# Altium PCB ProbeAmp.PcbDoc (part 2 of 2)
Units mm, origin at the board's own origin, x right, y up, seen from the top; angles counter-clockwise.
Board outline 75 x 25 mm, 6 copper layers (L1, L2, L3, L4, L5, L6), stack 1.04 mm thick; 123 components, 72 nets, 387 pads, 161 vias.
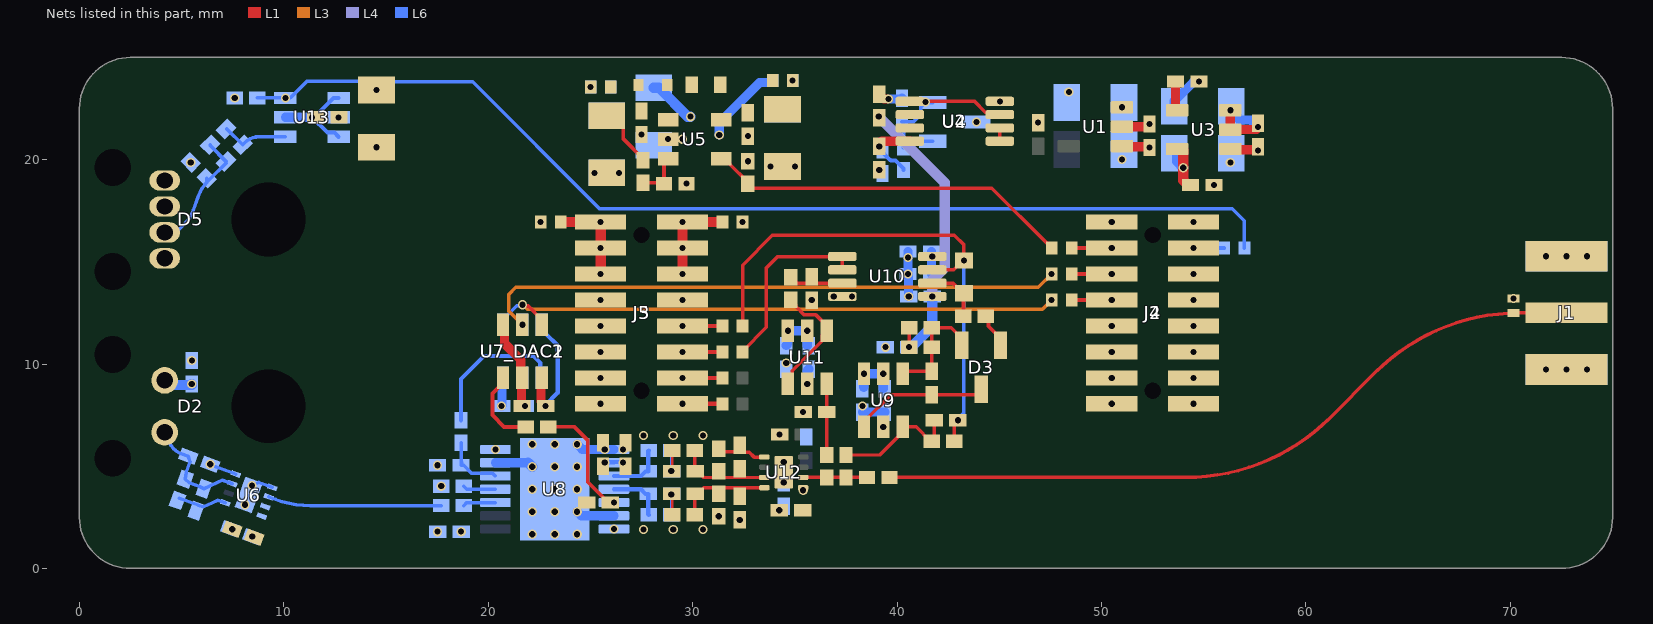
[diagram p6: the nets of this part, all layers, seen from the top]

## Via types
v1: diameter 0.45, hole 0.3, L1 to L6, tented both sides, 157 vias
v2: diameter 0.45, hole 0.3, L1 to L6, 4 vias

## Nets (pads, with @x,y where several pads share a name; then routed paths per layer and width w, separated by ;. In a path a pad name is that pad's centre, name@x,y a point inside that pad or via, vN(x,y) a via of type N, cw(c..) or ccw(c..) an arc to the next point about the centre after c; other vN are vias at no path point) (continued)
+2V50REF: C6.2 C23.1 C24.1 C34.1 C36.1 R7.1 R11.2 R13.2 U2.6 U2.7 U6.4 U10.5 | length 15.8
  L1 w0.171: R13.2@40.6,10.825 v1(40.575,10.825) 40.6,10.85 R11.2@40.6,11.775
  L1 w0.5: v1(39.1,22.1) 39.125,22.075 C6.2@39.125,22.046
  L4 w0.5: v1(39.1,22.1) 42.327,18.873 42.327,14.711 41.722,14.106 v1(41.722,13.308)
  L6 w0.171: C23.1@6.393,5.074 U6.4@7.643,4.619
  L6 w0.5: v1(40.575,10.825) 40.7,10.825 41.722,11.847 v1(41.722,13.308)
  other v1: 18.675,1.8 17.7,4.025 6.402,5.098
+3V3.CMN: J3.10 J5.10
  other v1: 25.5,11.865
+5V0: C1.2 C3.2 C19.2 C20.1 C25.1 C26.2 C27_DAC1.1 C27_DAC2.1 C31.2 C32.1 C46.1 C47.2 C50.2 C51.1 C52.2 C53.1 C55.2 C56.1 L1.1 L7.1 R1.2 R23.2 U1.1 U1.3 U2.8 U6.7 U6.8 U7_DAC1.3 U7_DAC1.6 U7_DAC2.3 U8.7 U8.9 U8.14 U9.5 U9.6 U10.8 U11.5 U11.6 U13.1 U13.3 U13.5 | length 28.1
  L1 w0.45: U7_DAC2.3@22.579,9.347 22.579,8.172 22.604,8.147 22.604,8.022 22.679,7.947 v1(22.804,7.947) ; v1(39.125,20.647) 39.125,20.772 39.254,20.9 U2.8@40.625,20.9 ; U1.1@51,20.659 51.034,20.625 52.316,20.625 v1(52.35,20.59)
  L6 w0.2: U13.3@12.677,21.117 12.477,21.317 12.127,21.317 v1(11.377,22.067) 11.425,22.115 11.525,22.115 12.427,23.017 U13.1@12.677,23.017 ; U7_DAC1.6@22.619,11.922 22.619,11.672 22.819,11.472 22.828,11.472 23.4,10.9 23.4,8.597 22.804,8 v1(22.804,7.947) ; U8.9@26.15,5.175 25.725,5.175 25.7,5.2 U8.9@26.6,5.2 ; C20.1@39.288,20.472 39.288,20.347 39.658,19.977 39.683,19.977 39.698,19.962 39.918,19.962 40.313,19.567 R1.2@40.313,19.492
  L6 w0.45: U13.5@10.077,22.067 v1(11.377,22.067) ; v1(20.654,7.947) 20.666,7.96 U7_DAC1.3@20.666,9.332 ; v1(31.3,21.2) 31.3,21.8 33.266,23.766 33.85,23.766 33.91,23.826 L1.1@33.91,23.861 ; C52.2@34.58,10.9 34.645,10.965 34.645,11.615 v1(34.655,11.625) v1(35.605,11.625) C51.1@35.605,10.9 ; C47.2@38.365,8.865 38.365,9.515 v1(38.375,9.525) v1(39.325,9.525) C46.1@39.325,8.8 ; C53.1@41.685,14.408 C50.2@41.685,15.508
  other v1: 8.458,1.555 26.15,1.925 25.7,5.175 26.6,5.175 20.35,5.825 41.722,15.258 32.44,16.95 5.451,19.864 51,22.559 14.527,23.404
+5V0AMP: J3.1 J3.3 J3.5 J5.1 J5.3 J5.5 L7.2 | length 4.5
  L1 w0.5: v1(29.5,14.405) v1(29.5,15.675) v1(29.5,16.945) 29.503,16.948 31.457,16.948 L7.2@31.46,16.95
+VBIAS: C16.2 C22.1 D2.2 L4.2 | length 3.7
  L6 w0.5: D2.2@4.173,8.974 4.174,8.976 C22.1@5.5,8.976 ; v1(5.499,9.024) C22.1@5.5,9.025 ; C16.2@28.1,23.511 28.35,23.511 29.761,22.1 v1(29.9,22.1)
-2V5: C8.2 C10.2 C48.2 C49.1 U3.5 U12.5 U12.9 | length 3
  L1 w0.5: U3.5@53.7,20.516 53.95,20.516 54,20.466 54,20.216 54,18.981 54.224,18.757 C10.2@54.349,18.757
  L6 w0.5: C8.2@53.7,20.207 53.7,19.909 54,19.609 v1(54,19.6)
  other v1: 35.405,3.825
  other v2: 34.455,4.2 34.455,5.2
-5V0: C7.2 C9.2 L6.1 U3.2 U3.3 | length 4.1
  L1 w0.45: v1(56.3,22.416) U3.2@56.3,21.466 57.575,21.466 57.65,21.541 v1(57.65,21.597)
  L6 w0.45: v1(56.3,22.416) 56.3,22.409 56.775,21.934 57.313,21.934 v1(57.65,21.597)
  other v1: 22.56,16.95
-5V0AMP: J3.2 J3.4 J3.6 J5.2 J5.4 J5.6 L6.2 | length 4.5
  L1 w0.5: L6.2@23.54,16.95 23.543,16.948 25.497,16.948 v1(25.5,16.945) v1(25.5,15.675) v1(25.5,14.405)
BIAS.EN: L10.1 R4.2 U5.4 | length 18
  L1 w0.177: U5.4@31.4,20.05 31.57,20.05 31.812,19.809 31.812,19.777 32.284,19.304 32.294,19.304 R4.2@32.7,18.897 ; R4.2@32.7,18.822 32.922,18.6 44.635,18.6 47.329,15.907 47.364,15.907 47.56,15.71 L10.1@47.56,15.675
CMN.ADC1_SPR: J3.14 J5.14
  other v1: 25.5,9.325
CMN.AMP_EN: J2.5 J4.5
  other v1: 54.5,14.405
CMN.AN0: J3.9 J5.9 L11.2 | length 2
  L1 w0.2: v1(29.5,11.865) L11.2@31.46,11.865
CMN.AN1: J3.11 J5.11 L12.2 | length 2
  L1 w0.2: v1(29.5,10.595) L12.2@31.46,10.595
CMN.AN2: J3.13 J5.13 L13.2 | length 2
  L1 w0.2: v1(29.5,9.325) L13.2@31.46,9.325
CMN.AN3: J3.15 J5.15 L14.2 | length 2
  L1 w0.2: v1(29.5,8.055) L14.2@31.46,8.055
CMN.FIBER_RX: J2.1 J4.1
  other v1: 54.5,16.945
CMN.FIBER_TX: J2.3 J4.3 L15.2 | length 1.5
  L6 w0.177: v1(54.5,15.675) L15.2@56.01,15.675
CMN.GPIO0: J2.2 J4.2
  other v1: 50.5,16.945
CMN.GPIO1: J2.4 J4.4 L10.2 | length 2
  L1 w0.177: L10.2@48.54,15.675 v1(50.5,15.675)
CMN.I2C4_SCL: J2.6 J4.6 L8.2 | length 2
  L1 w0.177: L8.2@48.54,14.374 48.571,14.405 v1(50.5,14.405)
CMN.I2C4_SDA: J2.8 J4.8 L9.2 | length 2
  L1 w0.177: L9.2@48.54,13.102 48.573,13.135 v1(50.5,13.135)
CMN.SPI1_CS1: J2.9 J4.9
  other v1: 54.5,11.865
CMN.SPI1_MISO: J2.11 J4.11
  other v1: 54.5,10.595
CMN.SPI1_MOSI: J2.13 J4.13
  other v1: 54.5,9.325
CMN.SPI1_SCK: J2.15 J4.15
  other v1: 54.5,8.055
CMN.USB_DM: J2.14 J4.14
  other v1: 50.5,9.325
CMN.USB_DP: J2.12 J4.12
  other v1: 50.5,10.595
CMN.VBAT1: J3.12 J5.12
  other v1: 25.5,10.595
COM: C1.1 C2.1 C3.1 C4.1 C5.1 C6.1 C7.1 C8.1 C9.1 C10.1 C11.1 C12.1 C13.1 C14.1 C15.1 C16.1 C17.1 C18.1 C19.1 C20.2 C22.2 C24.2 C25.2 C26.1 C27_DAC1.2 C27_DAC2.2 C28_DAC1.1 C28_DAC2.1 C31.1 C32.2 C34.2 C36.2 C40.2 C41.1 C43.1 C44.1 C45.2 C46.2 C47.1 C48.1 C49.2 C50.1 C51.2 C52.1 C53.2 C55.1 C56.2 D4.2 D5.1 D5.2 D5.4 J1.2 J2.7 J2.10 J2.16 J3.7 J3.8 J3.16 J4.7 J4.10 J4.16 J5.7 J5.8 J5.16 R3.1 R4.1 R22.2 R25.2 U1.2 U2.4 U3.1 U4.3 U5.2 U6.5 U6.9 U7_DAC1.2 U7_DAC2.2 U7_DAC2.6 U8.6 U8.8 U8.13 U8.15 U9.2 U10.4 U11.2 U13.2 | length 23.7
  L1 w0.45: U7_DAC2.6@20.719,11.925 20.794,11.85 20.794,11.006 21.594,10.206 21.594,9.4 U7_DAC2.2@21.669,9.325 ; U7_DAC2.2@21.629,9.347 21.629,8.022 21.704,7.947 v1(21.804,7.947) ; C6.1@39.125,23.196 39.125,23.071 39.2,22.996 39.325,22.996 39.358,22.963 v1(39.57,22.963) ; U1.2@51,21.609 52.275,21.609 52.35,21.684 v1(52.35,21.74) ; v1(55.499,18.757) C10.1@55.624,18.757 ; U3.1@56.3,20.516 56.334,20.482 57.615,20.482 v1(57.65,20.447)
  L6 w0.171: v2(8.45,4.059) 8.77,4.209 U6.5@9.428,3.969
  L6 w0.45: U8.6@20.35,5.175 U8.15@21.95,5.175 ; U7_DAC1.2@21.629,9.345 21.629,8.022 21.704,7.947 v1(21.804,7.947) ; v1(24.35,2.775) 24.55,2.575 U8.13@26.15,2.575 ; v1(24.35,6.075) 24.6,5.825 v1(25.7,5.825) U8.8@26.15,5.825 ; v1(35.605,9.025) 35.605,9.675 C51.2@35.68,9.75 ; C47.1@38.3,7.65 C46.2@39.4,7.65 39.325,7.575 v1(39.325,6.925) ; v1(39.57,22.963) 40.193,22.963 C5.1@40.238,23.008 ; C50.1@40.535,15.508 v1(40.535,15.208) v1(40.535,14.408) 40.553,14.39 40.553,13.326 v1(40.572,13.308) ; C7.1@53.55,22.609 53.55,22.859 54.507,23.816 v1(54.767,23.816)
  L6 w0.5: U8.15@21.95,5.175 v1(22.15,4.975)
  other v1: 22.15,1.675 23.25,1.675 24.35,1.675 17.525,1.8 27.6,1.9 29.05,1.9 30.5,1.9 7.478,1.921 32.3,2.375 31.275,2.552 22.15,2.775 23.25,2.775 34.235,2.85 22.15,3.875 23.25,3.875 24.35,3.875 23.25,4.975 24.35,4.975 17.519,5.05 26.6,5.825 22.15,6.075 23.25,6.075 27.6,6.5 29.05,6.5 30.5,6.5 34.255,6.55 35.405,7.65 38.3,7.95 25.5,8.055 50.5,8.055 71.75,9.73 72.75,9.73 73.75,9.73 34.58,10.05 5.5,10.175 39.425,10.825 50.5,11.865 25.5,13.135 29.5,13.135 35.822,13.125 54.5,13.135 70.15,13.2 36.9,13.3 37.8,13.3 71.75,15.27 72.75,15.27 73.75,15.27 29.7,18.825 25.2,19.349 26.4,19.349 39.125,19.497 33.8,19.661 35,19.661 56.3,19.857 32.7,19.922 51,20 14.527,20.604 28.8,21 29.5,21 32.7,21.147 27.5,21.225 46.9,21.809 43.888,21.842 12.677,22.067 45.025,22.85 7.602,23.017 48.4,23.3
  other v2: 8.108,3.119
Envelope: C33.2 C37.2 L11.1 R15.1 U10.7 | length 26.1
  L1 w0.171: L11.1@32.44,11.865 32.44,14.84 33.9,16.3 42.8,16.3 43.272,15.828 v1(43.272,15.064) 43.222,15.064 42.766,14.608 U10.7@41.722,14.608 ; R15.1@42.8,6.227 42.8,7.077 v1(42.975,7.252)
  L6 w0.171: v1(42.975,7.252) 42.975,7.328 43.272,7.625 v1(43.272,15.064)
FIBER.Tx: L15.1 R25.1 U13.6 | length 52.8
  L6 w0.171: R25.1@8.702,23.017 v1(10.077,23.017) 10.327,23.017 11.155,23.844 14.709,23.844 14.754,23.8 19.241,23.8 25.441,17.6 56.4,17.6 56.99,17.01 L15.1@56.99,15.675
GAIN: C28_DAC1.2 R6_DAC1.2 U8.5 | length 3.1
  L6 w0.171: R6_DAC1.2@18.669,6.15 C28_DAC1.2@18.669,5.05 ; C28_DAC1.2@18.7,5.196 C28_DAC1.2@18.669,5.05 ; U8.5@20.35,4.525 20.21,4.665 19.179,4.665 18.794,5.05 C28_DAC1.2@18.669,5.05
I2C.SCL.5V: L8.1 U7_DAC1.5 U7_DAC2.5 | length 28.7
  L1 w0.171: v1(21.669,11.922) U7_DAC2.5@21.669,11.925
  L3 w0.177: v1(21.669,11.922) 21,12.591 21,13.4 21.351,13.751 46.906,13.751 v1(47.56,14.405)
I2C.SDA.5V: L9.1 U7_DAC1.4 U7_DAC2.4 | length 29.2
  L1 w0.171: v1(21.669,12.9) 21.722,12.847 21.947,12.847 22.619,12.175 U7_DAC2.4@22.619,11.925
  L3 w0.171: v1(21.669,12.9) 21.693,12.9 21.908,12.685 47.11,12.685 v1(47.56,13.135)
  L6 w0.171: U7_DAC1.4@20.719,11.922 20.719,12.172 21.393,12.847 v1@21.642,12.847 ; v1@21.647,12.847 v1@21.642,12.847 ; v1@21.695,12.9 v1@21.642,12.847
IN: R10.1 U6.6 | length 8.5
  L6 w0.171: U6.6@9.257,3.499 9.594,3.377 ccw(c11.304,8.075) 11.304,3.075 R10.1@17.7,3.075
IN_N: C30.2 C42.2 R9.2 R21.1 | length 2.1
  L1 w0.115: v1(28.95,3.625) 29,3.575 R21.1@29,2.625
  L6 w0.115: R9.2@28.95,2.625 v1(28.95,3.625) C30.2@28.975,3.65
IN_P: C29.2 C38.2 R8.2 R18.1 | length 2.1
  L1 w0.115: v1(28.95,4.775) 29,4.825 R18.1@29,5.775
  L6 w0.115: R8.2@28.95,5.775 v1(28.95,4.775) C29.2@28.975,4.75
NetC5_2: C5.2 R1.1 U2.3 U2.5 U4.1 U4.2 | length 9.6
  L1 w0.177: U2.5@40.625,22.85 43.788,22.85 44.316,22.322 44.903,22.322 U2.3@45.025,22.2
  L6 w0.177: R1.1@40.313,20.592 R1.1@40.313,20.655 ; v1(41.393,22.819) U4.2@41.42,22.792 ; U4.1@41.738,20.892 40.549,20.892 R1.1@40.313,20.655 ; U4.2@41.738,22.792 U4.2@41.42,22.792 ; R1.1@40.313,20.655 40.313,21.783 C5.2@40.238,21.858 40.803,21.858 41.151,22.206 41.151,22.555 41.388,22.792 U4.2@41.42,22.792
NetC11_2: C11.2 U3.4 | length 1.4
  L1 w0.45: C11.2@53.617,23.816 53.617,22.491 53.692,22.416 U3.4@53.7,22.416
NetC12_2: C12.2 L1.2 L2.1
  other v1: 34.89,23.861
NetC13_2: C13.2 C17.2 L2.2 L5.1 U5.5
NetC14_2: C14.2 C18.2 D1.1 L3.1 R2.2 | length 3.1
  L1 w0.177: C14.2@25.8,22.149 26.05,22.149 26.612,21.587 26.612,21.009 27.575,20.045 R2.2@27.575,19.97
NetC15_2: C15.2 L3.2 L4.1
  other v1: 25.007,23.549
NetC21_1: C21.1 C23.2 D2.1 R5.1 U6.3 | length 5.6
  L6 w0.171: D2.1@4.173,6.658 4.419,6.131 ccw(c5.325,6.554) 4.983,5.614 C23.2@5.321,5.491 5.415,5.228 5.219,4.689 R5.1@5.179,4.369 5.37,4.194 5.906,3.998 C21.1@6.099,3.9 7,4.321 U6.3@7.472,4.149 U6.3@7.324,4.224
NetC21_2: C21.2 R5.2 U6.1 | length 2.4
  L6 w0.171: R5.2@4.882,3.439 5.808,3.101 5.824,3.096 6.065,3.008 6.774,3.339 U6.1@7.13,3.209
NetC29_1: C29.1 R8.1 U8.10 | length 2.8
  L6 w0.2: U8.10@26.15,4.525 27.475,4.525 27.7,4.75 C29.1@27.825,4.75 27.825,5.75 R8.1@27.85,5.775
NetC30_1: C30.1 R9.1 U8.11 | length 2.8
  L6 w0.2: U8.11@26.15,3.875 27.475,3.875 27.7,3.65 C30.1@27.825,3.65 27.825,2.65 R9.1@27.85,2.625
NetC33_1: C33.1 R12.2 U10.6 | length 2.9
  L1 w0.18: U10.6@41.722,13.958 42.727,13.958 43.222,13.464 C33.1@43.272,13.464 43.243,13.436 R12.2@43.243,12.338
NetC35_1: C35.1 D3.2 R11.1 R13.1 U9.4 | length 5.6
  L1 w0.171: U9.4@40.275,9.525 40.4,9.65 C35.1@41.7,9.65 R13.1@41.7,10.825 R11.1@41.7,11.775 42.648,11.775 43.16,11.263 D3.2@43.16,10.913
NetC35_2: C35.2 D3.3 U9.1 | length 6.7
  L1 w0.171: U9.1@38.375,7.175 39.7,8.5 C35.2@41.7,8.5 43.87,8.5 44.11,8.74 D3.3@44.11,8.763 ; U9.1@38.394,6.925 U9.1@38.394,7.175
NetC37_1: C37.1 R14.1 R15.2 U9.3 | length 6.3
  L1 w0.171: R14.1@37.505,5.55 39.169,5.55 ; 39.15,5.55 40.275,6.675 U9.3@40.275,6.925 40.927,6.925 41.625,6.227 R15.2@41.7,6.227 41.825,6.352 C37.1@41.825,7.252
NetC38_1: C38.1 C39.2 R18.2 R19.1 U12.3 | length 5.1
  L1 w0.17: R18.2@30.1,5.775 30.1,4.775 C38.1@30.125,4.75 30.25,4.75 30.55,4.45 32.5,4.45 ; C39.2@32.3,4.9 C39.2@32.3,4.875 32.5,4.675 32.5,4.45 ; U12.3@33.505,4.45 32.5,4.45
NetC39_1: C39.1 R19.2 U12.1 | length 2.7
  L1 w0.17: R19.2@31.275,5.85 31.425,5.7 32.085,5.7 C39.1@32.3,5.915 ; C39.1@32.3,6.025 C39.1@32.3,5.915 ; U12.1@33.505,5.45 33,5.45 32.765,5.685 32.515,5.685 32.3,5.9 C39.1@32.3,5.915
NetC40_1: C40.1 R16.1 U10.3 | length 2.6
  L1 w0.171: R16.1@34.797,14.31 34.797,14.298 R16.1@35.037,14.058 ; R16.1@35.037,13.958 U10.3@37.322,13.958
NetC41_2: C41.2 R17.2 U11.3 | length 3.5
  L1 w0.18: R17.2@36.555,5.55 C41.2@36.555,7.65 U11.3@36.555,9.025
NetC42_1: C42.1 C43.2 R21.2 R22.1 U12.4 | length 4.5
  L1 w0.17: R21.2@30.1,2.625 30.1,3.625 C42.1@30.125,3.65 30.25,3.65 30.55,3.95 U12.4@33.505,3.95
NetC54_1: C54.1 R24.1 U13.4 | length 3.3
  L6 w0.18: R24.1@7.208,21.5 C54.1@7.986,20.723 8.087,20.824 cw(c8.794,20.117) 8.794,21.117 U13.4@10.077,21.117
NetC54_2: C54.2 D5.3 R23.1 R24.2 | length 6.5
  L6 w0.171: D5.3@4.173,16.213 4.513,16.213 4.968,16.668 5.114,16.814 ccw(c3.7,18.228) 5.581,17.55 5.819,18.208 cw(c7.7,17.529) 6.286,18.943 6.144,18.802 6.229,18.886 R23.1@6.229,19.086 ; R23.1@6.333,18.981 C54.2@7.173,19.82 ; R24.2@6.395,20.723 6.395,20.687 C54.2@7.173,19.91
NetD1_2: D1.2 L5.2 U5.1
NetD3_1: D3.1 R12.1 | length 1.7
  L1 w0.18: R12.1@44.343,12.338 44.475,12.207 44.475,11.848 45.06,11.263 D3.1@45.06,10.913
NetR2_1: R2.1 R3.2 U5.3 | length 2.4
  L1 w0.177: R2.1@27.575,18.87 28.555,18.87 R3.2@28.6,18.825 28.6,19.85 U5.3@28.8,20.05
NetR6_DAC1_1: R6_DAC1.1 U7_DAC1.1 | length 7.3
  L6 w0.2: R6_DAC1.1@18.669,7.25 18.669,9.269 19.795,10.395 22.205,10.395 22.545,10.055 22.545,9.396 U7_DAC1.1@22.619,9.322
NetR6_DAC2_1: R6_DAC2.1 U7_DAC2.1 | length 3.9
  L1 w0.2: U7_DAC2.1@20.719,9.325 20.719,9.075 20.199,8.555 20.199,7.501 20.778,6.922 R6_DAC2.1@21.842,6.922
NetR7_2: R7.2 U8.4 | length 1.6
  L6 w0.171: R7.2@18.8,4.025 18.95,3.875 U8.4@20.35,3.875
NetR10_2: R10.2 U8.3 | length 1.6
  L6 w0.171: R10.2@18.8,3.075 18.95,3.225 U8.3@20.35,3.225
NetR14_2: R14.2 R17.1 R20.1 U12.6 | length 3.1
  L1 w0.171: U12.6@35.405,4.45 R17.1@36.555,4.45 R20.1@38.53,4.45
NetR16_2: R16.2 U11.1 U11.4 | length 6
  L1 w0.171: U11.1@34.655,9.025 34.869,9.24 34.869,9.665 36.34,11.135 36.34,11.41 U11.4@36.555,11.625 36.555,11.875 36.03,12.4 35.458,12.4 35.036,12.822 35.036,12.91 R16.2@34.797,13.15
NetU2_1: U2.1 U2.2 | length 0.7
  L1 w0.177: U2.1@45.025,20.9 U2.2@45.025,21.55
Offset: L12.1 U10.1 U10.2 | length 9.2
  L1 w0.171: L12.1@32.44,10.595 32.44,10.63 33.6,11.79 33.6,14.7 34.158,15.258 U10.1@37.322,15.258 U10.2@37.322,14.608
OFS: C28_DAC2.2 R6_DAC2.2 U8.12 | length 6
  L1 w0.171: R6_DAC2.2@22.942,6.922 24.22,6.922 24.857,6.285 24.857,4.243 25.635,3.465 25.635,3.44 25.85,3.225 v1(26.15,3.225)
  L6 w0.171: v1(26.15,3.225) 26.175,3.225 U8.12@26.2,3.2
PROBE_OUT: D4.1 J1.1 R20.2 | length 36.2
  L1 w0.171: R20.2@39.63,4.45 54.108,4.45 ccw(c54.108,14.45) 61.179,7.379 63.371,9.571 cw(c70.442,2.5) 70.442,12.5 D4.1@70.15,12.5 J1.1@72.75,12.5
pads on no net: D2. D5. J4. J5. L13.1 L14.1 U1.4 U6.2 U8.1 U8.2 U12.2

## Polygon pours and split planes (outlines as drawn)
COM on L3 "COM_L03_P008" (solid, remove dead copper, pour order 8): 0.254,2.5 ccw(c2.5,2.5) 2.5,0.254 2.7,0.254 2.7,1.004 2.5,1.004 cw(c2.5,2.5) 1.004,2.5 1.004,22.5 cw(c2.5,22.5) 2.5,23.996 72.5,23.996 cw(c72.5,22.5) 73.996,22.5 73.996,2.5 cw(c72.5,2.5) 72.5,1.004 2.904,1.004 2.904,0.254 72.5,0.254 ccw(c72.5,2.5) 74.746,2.5 74.746,22.5 ccw(c72.5,22.5) 72.5,24.746 2.5,24.746 ccw(c2.5,22.5) 0.254,22.5
+5V0 on L3 "+5V0_L03_P006" (solid, remove dead copper, pour order 6): 1.204,2.5 ccw(c2.5,2.5) 2.5,1.204 9.4,1.204 9.4,2.7 5.6,2.7 5.6,5.7 21.8,5.7 21.8,4 25.8,4 25.8,1.7 27.1,1.7 27.1,8.5 39.5,8.5 39.5,11.4 41.2,11.4 41.2,6.1 35.1,6.1 35.1,4.1 48.8,4.1 48.8,18.3 36.2,18.3 36.2,15.3 31.103,15.3 29.803,16.6 25.283,16.6 24.783,16.1 22.1,16.1 22.1,17.5 24.203,17.5 24.703,18 30.383,18 31.683,16.7 34.8,16.7 34.8,19.7 52.6,19.7 52.6,21.3 56.8,21.3 56.8,22.504 58.2,22.504 58.2,19.9 54.97,19.9 54.97,17.1 50.2,17.1 50.2,2.7 33.7,2.7 33.7,6.1 29.7,6.1 29.7,1.204 72.5,1.204 ccw(c72.5,2.5) 73.796,2.5 73.796,22.5 ccw(c72.5,22.5) 72.5,23.796 2.5,23.796 ccw(c2.5,22.5) 1.204,22.5
-5V0 on L3 "-5V0_L03_P005" (solid, remove dead copper, pour order 5): 22.3,16.3 24.7,16.3 25.2,16.8 29.886,16.8 31.186,15.5 36,15.5 36,18.5 53.57,18.5 53.57,20.1 58,20.1 58,22.304 57,22.304 57,21.1 52.8,21.1 52.8,19.5 35,19.5 35,16.5 31.6,16.5 30.3,17.8 24.786,17.8 24.286,17.3 22.3,17.3
+2V50REF on L3 "+2V50REF_L03_P003" (solid, remove dead copper, pour order 3): 9.6,1.204 9.6,2.9 5.8,2.9 5.8,5.5 21.6,5.5 21.6,3.8 25.6,3.8 25.6,1.5 27.3,1.5 27.3,8.3 39.7,8.3 39.7,11.2 41,11.2 41,6.3 29.5,6.3 29.5,1.204
+VBIAS on L3 "+VBIAS_L03_P002" (solid, remove dead copper, pour order 2): 3.6,8.4 5.8,8.4 5.8,10.7 7.3,10.7 7.3,20 14.3,20 14.3,21.6 30.2,21.6 30.2,22.6 13.3,22.6 13.3,21 6.3,21 6.3,11.7 3.6,11.7
-2V5 on L3 "-2V5_L03_P004" (solid, remove dead copper, pour order 4): 33.9,2.9 33.9,6.1 34.9,6.1 34.9,3.9 49,3.9 49,18.3 53.77,18.3 53.77,19.9 54.77,19.9 54.77,17.3 50,17.3 50,2.9
COM on L5 "COM_L05_P010" (solid, remove dead copper, pour order 10): 0,2.5 0,22.5 cw(c2.5,22.5) 2.5,25 72.5,25 cw(c72.5,22.5) 75,22.5 75,2.5 cw(c72.5,2.5) 72.5,0 2.5,0 cw(c2.5,2.5)
COM on L2 "COM_L02_P001" (solid, remove dead copper, pour order 1): 0,2.5 0,22.5 cw(c2.5,22.5) 2.5,25 72.5,25 cw(c72.5,22.5) 75,22.5 75,2.5 cw(c72.5,2.5) 72.5,0 2.5,0 cw(c2.5,2.5)
COM on L4 "COM_L04_P007" (solid, remove dead copper, pour order 7): 0.254,2.5 ccw(c2.5,2.5) 2.5,0.254 2.7,0.254 2.7,1.004 2.5,1.004 cw(c2.5,2.5) 1.004,2.5 1.004,22.5 cw(c2.5,22.5) 2.5,23.996 72.5,23.996 cw(c72.5,22.5) 73.996,22.5 73.996,2.5 cw(c72.5,2.5) 72.5,1.004 2.904,1.004 2.904,0.254 72.5,0.254 ccw(c72.5,2.5) 74.746,2.5 74.746,22.5 ccw(c72.5,22.5) 72.5,24.746 2.5,24.746 ccw(c2.5,22.5) 0.254,22.5
COM on L6 "COM_L06_P000" (solid, remove dead copper, pour order 0): 0,2.5 0,22.5 cw(c2.5,22.5) 2.5,25 72.5,25 cw(c72.5,22.5) 75,22.5 75,2.5 cw(c72.5,2.5) 72.5,0 2.5,0 cw(c2.5,2.5)
COM on L1 "COM_L01_P009" (solid, remove dead copper, pour order 9): 0,2.5 0,22.5 cw(c2.5,22.5) 2.5,25 72.5,25 cw(c72.5,22.5) 75,22.5 75,2.5 cw(c72.5,2.5) 72.5,0 2.5,0 cw(c2.5,2.5)

## Keep-outs
L6:
  circle w0.05: c9.253,17.072 r2.75
  circle w0.05: c9.253,7.928 r2.75

## Other copper
L1:
  region net -2V5: 34.005,3.35 34.005,4.55 34.905,4.55 34.905,4.075 35.81,4.075 35.81,2.55 34.96,2.55 34.96,3.35
  region net NetC14_2: 24.9,21.499 24.9,22.799 25.202,22.799 ccw(c25.202,23.299) 25.702,23.299 25.702,23.954 27.8,23.954 27.8,21.95 27.151,21.95 ccw(c27.151,21.499) 26.7,21.499
  region net NetD1_2: 28.3,21.62 28.3,23.554 cw(c28.8,23.554) 28.8,24.054 30.25,24.054 30.25,23.254 29.739,22.743 ccw(c30.8,21.683) 29.3,21.683 29.3,21.62
  region net NetC13_2: 30.9,21.62 30.9,24.181 34.195,24.181 34.195,23.111 35.3,23.111 35.3,21.811 31.9,21.811 31.9,21.62
  region net +2V5: 34.98,6.25 34.98,6.853 35.855,6.853 35.855,4.825 35.155,4.825 35.155,6.25
  region net +2V50REF: 38.825,21.325 41.325,21.325 41.325,22.471 38.825,22.471
L2:
  pour cut-out: 37.975,6.275 38.775,6.275 38.775,7.311 39.764,8.3 41.3,8.3 41.3,7.988 44.535,7.988 44.535,9.538 43.585,9.538 43.585,11.913 43.743,11.913 43.743,12.964 43.822,12.964 43.822,15.564 42.722,15.564 42.722,14.933 40.922,14.933 40.922,13.633 42.743,13.633 42.743,12.2 41.2,12.2 41.2,10.175 39.875,10.175 39.875,8.7 39.645,8.7 38.52,7.575 37.975,7.575
  pour cut-out: 34.255,9.675 34.634,9.675 36.155,11.196 36.155,12.004 35.959,12.2 35.38,12.2 34.93,12.65 34.372,12.65 34.372,13.65 35.222,13.65 35.222,12.908 35.519,12.611 36.131,12.611 36.466,12.275 36.955,12.275 36.955,10.975 36.416,10.975 35.055,9.613 35.055,8.375 34.255,8.375
  pour cut-out: 30.6,2.2 30.6,3.152 31.9,3.152 31.9,3 32.7,3 32.7,3.725 33.855,3.725 33.855,4.675 32.7,4.675 32.7,5.225 33.855,5.225 33.855,5.675 33.035,5.675 32.7,6.01 32.7,6.55 31.9,6.55 31.9,6.35 30.85,6.35 30.85,6.2 29.6,6.2 29.6,2.2
L5:
  pour cut-out: 9.517,3.165 ccw(c11.304,8.075) 11.304,2.85 17.2,2.85 17.2,2.65 19.3,2.65 19.3,2.9 21.2,2.9 21.2,4.2 19.3,4.2 19.3,4.45 18.3,4.45 18.3,3.5 17.2,3.5 17.2,3.3 11.304,3.3 cw(c11.304,8.075) 9.671,3.588 9.005,3.83 8.851,3.408
  pour cut-out: 4.691,5.295 5.02,5.175 4.608,4.045 5.595,3.685 5.543,3.544 6.295,3.27 6.518,3.883 6.968,4.093 7.724,3.818 7.878,4.241 7.043,4.545 6.526,4.303 5.715,4.599 5.749,4.693 5.608,4.745 5.951,5.687 4.714,6.138 4.713,6.138 ccw(c4.173,6.658) 4.173,7.408 ccw(c4.173,6.658) 3.423,6.658 ccw(c4.173,6.658) 4.305,5.92 4.305,5.921 ccw(c5.325,6.554) 4.763,5.493
  pour cut-out: 25.3,3.55 25.3,4.85 27.35,4.85 27.35,6.2 28.35,6.2 28.35,2.2 27.35,2.2 27.35,3.55
L3:
  region net COM: 2.6,0.254 2.6,1.004 2.946,1.004 2.946,0.254
L4:
  region net COM: 2.6,0.254 2.6,1.004 2.946,1.004 2.946,0.254
L6:
  region net NetC12_2: 33.5,21.811 33.5,23.111 34.105,23.111 ccw(c34.105,23.611) 34.605,23.611 34.605,24.181 35.3,24.181 35.3,21.811
  region net +VBIAS: 25.702,23.229 25.702,24.161 29,24.161 29,22.861 27.2,22.861 27.2,22.979 ccw(c26.95,22.979) 26.95,23.229
  region net NetC15_2: 26.7,21.499 26.7,22.799 25.792,22.799 cw(c25.792,23.299) 25.292,23.299 25.292,23.869 24.597,23.869 24.597,21.499
  region net +5V0: 7.956,1.419 8.162,1.982 8.172,1.979 ccw(c8.257,2.214) 8.492,2.128 8.877,3.185 cw(c8.924,3.168) 8.941,3.215 9.317,3.078 cw(c9.3,3.031) 9.347,3.014 8.894,1.769 ccw(c8.941,1.752) 8.923,1.705 8.96,1.692 8.755,1.128

## Silkscreen, mask and mechanical layers (free items; w line width, h text height)
Top Overlay:
  text "Rev. A" at 67.4,18.629 h1 r90
  text "Probe Base" at 65.97,8.395 h4.5 r90
  text "Optically Isolated" at 62.627,0.979 h4.5 r90
Mechanical 1:
  the board outline again, w0.01
KEEPOUT_TOP:
  circle w0.1: c4.5,30.5 r1.65
  circle w0.1: c65.5,30.5 r1.65
  circle w0.1: c4.5,4.5 r1.65
  circle w0.1: c65.5,4.5 r1.65
  lines w0.1: 0,4.5 ccw(c4.5,4.5) 4.5,0 65.5,0 ccw(c65.5,4.5) 70,4.5 70,13.5 69,13.5 69,11.486 cw(c67,11.486) 67.111,9.489 ccw(c67.5,2.5) 61.137,5.417 cw(c56.591,7.5) 56.591,2.5 14.5,2.5 cw(c14.5,7.5) 9.5,7.5 9.5,13 0,13 0,4.5 ; 0,22 0,30.5 cw(c4.5,30.5) 4.5,35 65.5,35 cw(c65.5,30.5) 70,30.5 70,21.5 69,21.5 69,23.514 ccw(c67,23.514) 67.111,25.511 cw(c67.5,32.5) 61.137,29.583 ccw(c56.591,27.5) 56.591,32.5 14.5,32.5 ccw(c14.5,27.5) 9.5,27.5 9.5,22 0,22
KEEPOUT_BOTTOM:
  circle w0.1: c65.5,30.5 r1.65
  circle w0.1: c4.5,30.5 r1.65
  circle w0.1: c65.5,4.5 r1.65
  circle w0.1: c4.5,4.5 r1.65
  lines w0.1: 0,4.5 ccw(c4.5,4.5) 4.5,0 65.5,0 ccw(c65.5,4.5) 70,4.5 70,11.5 69,11.5 69,11.486 cw(c67,11.486) 67.111,9.489 ccw(c67.5,2.5) 61.137,5.417 cw(c56.591,7.5) 56.591,2.5 14.5,2.5 cw(c14.5,7.5) 9.5,7.5 9.5,13 0,13 0,4.5 ; 0,22 9.5,22 9.5,27.5 cw(c14.5,27.5) 14.5,32.5 56.591,32.5 cw(c56.591,27.5) 61.137,29.583 ccw(c67.5,32.5) 67.111,25.511 cw(c67,23.514) 69,23.514 69,23.5 70,23.5 70,30.5 ccw(c65.5,30.5) 65.5,35 4.5,35 ccw(c4.5,30.5) 0,30.5 0,22
Fab Notes:
  lines w0.1: 0,40.5 52,40.5 ; 16,37.5 16,43.5 ; 27,37.5 27,43.5 ; 41,37.5 41,43.5 ; 0,37.5 0,43.5 52,43.5 52,37.5 0,37.5 ; 0,49.5 16,49.5 16,52.5 0,52.5 0,49.5
  text "Stackup" at 1.25,53.75 h1.5
  text "JLC04161H-7628" at 1.2,50.3 h1
  text "Impedance" at 1.25,44.75 h1.5
  text "Signal Layer" at 17,41.5 h1
  text "Reference Layer" at 28,41.5 h1
  text "Trace Width" at 42,41.5 h1
  text "Impedance Type" at 1.2,41.3 h1
  text "50 Ohm Microstrip" at 1,38.5 h1
  text "0.3493" at 42,38.5 h1
  text "L1" at 17.2,38.3 h1
  text "L2" at 28.2,38.3 h1
OL1:
  lines w0.05: 34,3.4 34.005,3.4 ; 24.9,21.499 24.9,22.799 25.202,22.799 ccw(c25.202,23.299) 25.702,23.299 25.702,23.954 27.104,23.954 27.8,23.954 27.8,21.95 27.151,21.95 ccw(c27.151,21.499) 26.7,21.499 24.9,21.499 ; 28.3,21.62 28.3,23.554 cw(c28.8,23.554) 28.8,24.054 30.25,24.054 30.25,23.254 29.739,22.743 ccw(c30.8,21.683) 29.3,21.683 29.3,21.62 28.3,21.62 ; 30.9,21.62 31.9,21.62 31.9,21.811 35.3,21.811 35.3,23.111 34.195,23.111 34.195,23.541 34.195,24.181 30.9,24.181 30.9,21.62 ; 34.005,3.35 34.66,3.35 34.96,3.35 34.96,2.55 35.81,2.55 35.81,4.075 35.405,4.075 34.905,4.075 34.905,4.55 34.005,4.55 34.005,4.212 34.005,3.35 ; 34.98,6.25 35.155,6.25 35.155,4.95 35.155,4.825 35.405,4.825 35.855,4.825 35.855,6.853 34.98,6.853 34.98,6.85 34.98,6.25 ; 38.825,21.325 41.325,21.325 41.325,21.55 41.325,22.471 39.425,22.471 38.825,22.471 38.825,21.325
OL2:
  lines w0.05: 29.6,2.2 30.6,2.2 30.6,3.152 31.9,3.152 31.9,3 32.7,3 32.7,3.725 33.855,3.725 33.855,4.675 32.7,4.675 32.7,5.225 33.855,5.225 33.855,5.675 33.035,5.675 32.7,6.01 32.7,6.55 31.9,6.55 31.9,6.35 30.85,6.35 30.85,6.2 29.6,6.2 29.6,2.2 ; 34.255,8.375 35.055,8.375 35.055,9.613 36.416,10.975 36.955,10.975 36.955,12.275 36.466,12.275 36.131,12.611 35.519,12.611 35.222,12.908 35.222,13.65 34.372,13.65 34.372,12.65 34.93,12.65 35.38,12.2 35.959,12.2 36.155,12.004 36.155,11.196 34.634,9.675 34.255,9.675 34.255,8.375 ; 37.975,6.275 37.975,7.575 38.52,7.575 39.645,8.7 39.875,8.7 39.875,10.175 41.2,10.175 41.2,12.2 42.743,12.2 42.743,13.633 40.922,13.633 40.922,14.933 42.722,14.933 42.722,15.564 43.822,15.564 43.822,12.964 43.743,12.964 43.743,11.913 43.585,11.913 43.585,9.538 44.535,9.538 44.535,7.988 41.3,7.988 41.3,8.3 39.764,8.3 38.775,7.311 38.775,6.275 37.975,6.275
OL3:
  drawing of 175 lines, arcs and shapes, not listed
OL5:
  lines w0.05: 4.305,5.92 cw(c4.173,6.658) 3.423,6.658 cw(c4.173,6.658) 4.173,7.408 cw(c4.173,6.658) 4.713,6.138 5.951,5.687 5.608,4.745 5.749,4.693 5.715,4.599 6.526,4.303 7.043,4.545 7.878,4.241 7.724,3.818 6.968,4.093 6.518,3.883 6.295,3.27 5.543,3.544 5.595,3.685 4.608,4.045 5.02,5.175 4.691,5.295 4.763,5.493 cw(c5.325,6.554) 4.305,5.921 ; 5.9,6.1 5.9,6.3 ; 6,6.1 6,6.3 ; 6.048,6.333 6.133,6.152 ; 6.06,6.072 6.128,6.26 ; 18.185,1.749 18.315,1.824 ; 18.225,1.6 18.375,1.6 ; 18.225,1.7 18.375,1.7 ; 18.318,1.576 18.424,1.682 ; 17.2,3.3 17.2,3.5 ; 17.2,3.3 11.304,3.3 cw(c11.304,8.075) 9.671,3.588 9.005,3.83 8.851,3.408 9.517,3.165 ccw(c11.304,8.075) 11.304,2.85 17.2,2.85 17.2,2.65 19.3,2.65 19.3,2.9 21.2,2.9 21.2,4.2 19.3,4.2 19.3,4.45 18.3,4.45 18.3,3.5 17.2,3.5 ; 17.2,3.3 17.2,3.5 ; 25.3,3.55 27.35,3.55 27.35,2.2 28.35,2.2 28.35,6.2 27.35,6.2 27.35,4.85 25.3,4.85 25.3,3.55
OL6:
  lines w0.05: 24.597,21.499 24.597,23.869 24.722,23.869 25.292,23.869 25.292,23.299 ccw(c25.792,23.299) 25.792,22.799 26.697,22.799 26.697,21.499 24.597,21.499 ; 25.702,23.229 26.95,23.229 cw(c26.95,22.979) 27.2,22.979 27.2,22.861 29,22.861 29,24.161 25.702,24.161 25.702,23.869 25.702,23.229 ; 33.5,21.811 33.5,23.111 34.105,23.111 ccw(c34.105,23.611) 34.605,23.611 34.605,24.181 35.175,24.181 35.3,24.181 35.3,21.811 33.5,21.811

## Text inside footprints (layer, text, board x,y; h text height)
D2: Top Courtyard "PCB EDGE" at -0.047,6.228 h0.5 r90
D5: Top Courtyard "PCB EDGE" at -0.047,15.372 h0.5 r90
J1: Top Courtyard "PCB Edge" at 75.217,14.148 h0.5 r270